# Altium PCB Urukul.PcbDoc (part 10 of 15)
Units mm, origin at the board's own origin, x right, y up, seen from the top; angles counter-clockwise.
Board outline 161.99 x 100 mm, 6 copper layers (L1, L2, L3, L4, P5, L6), stack 1.548 mm thick; 1078 components, 609 nets, 3798 pads, 2552 vias.
Unrouted connection lines stored in the file: 1.
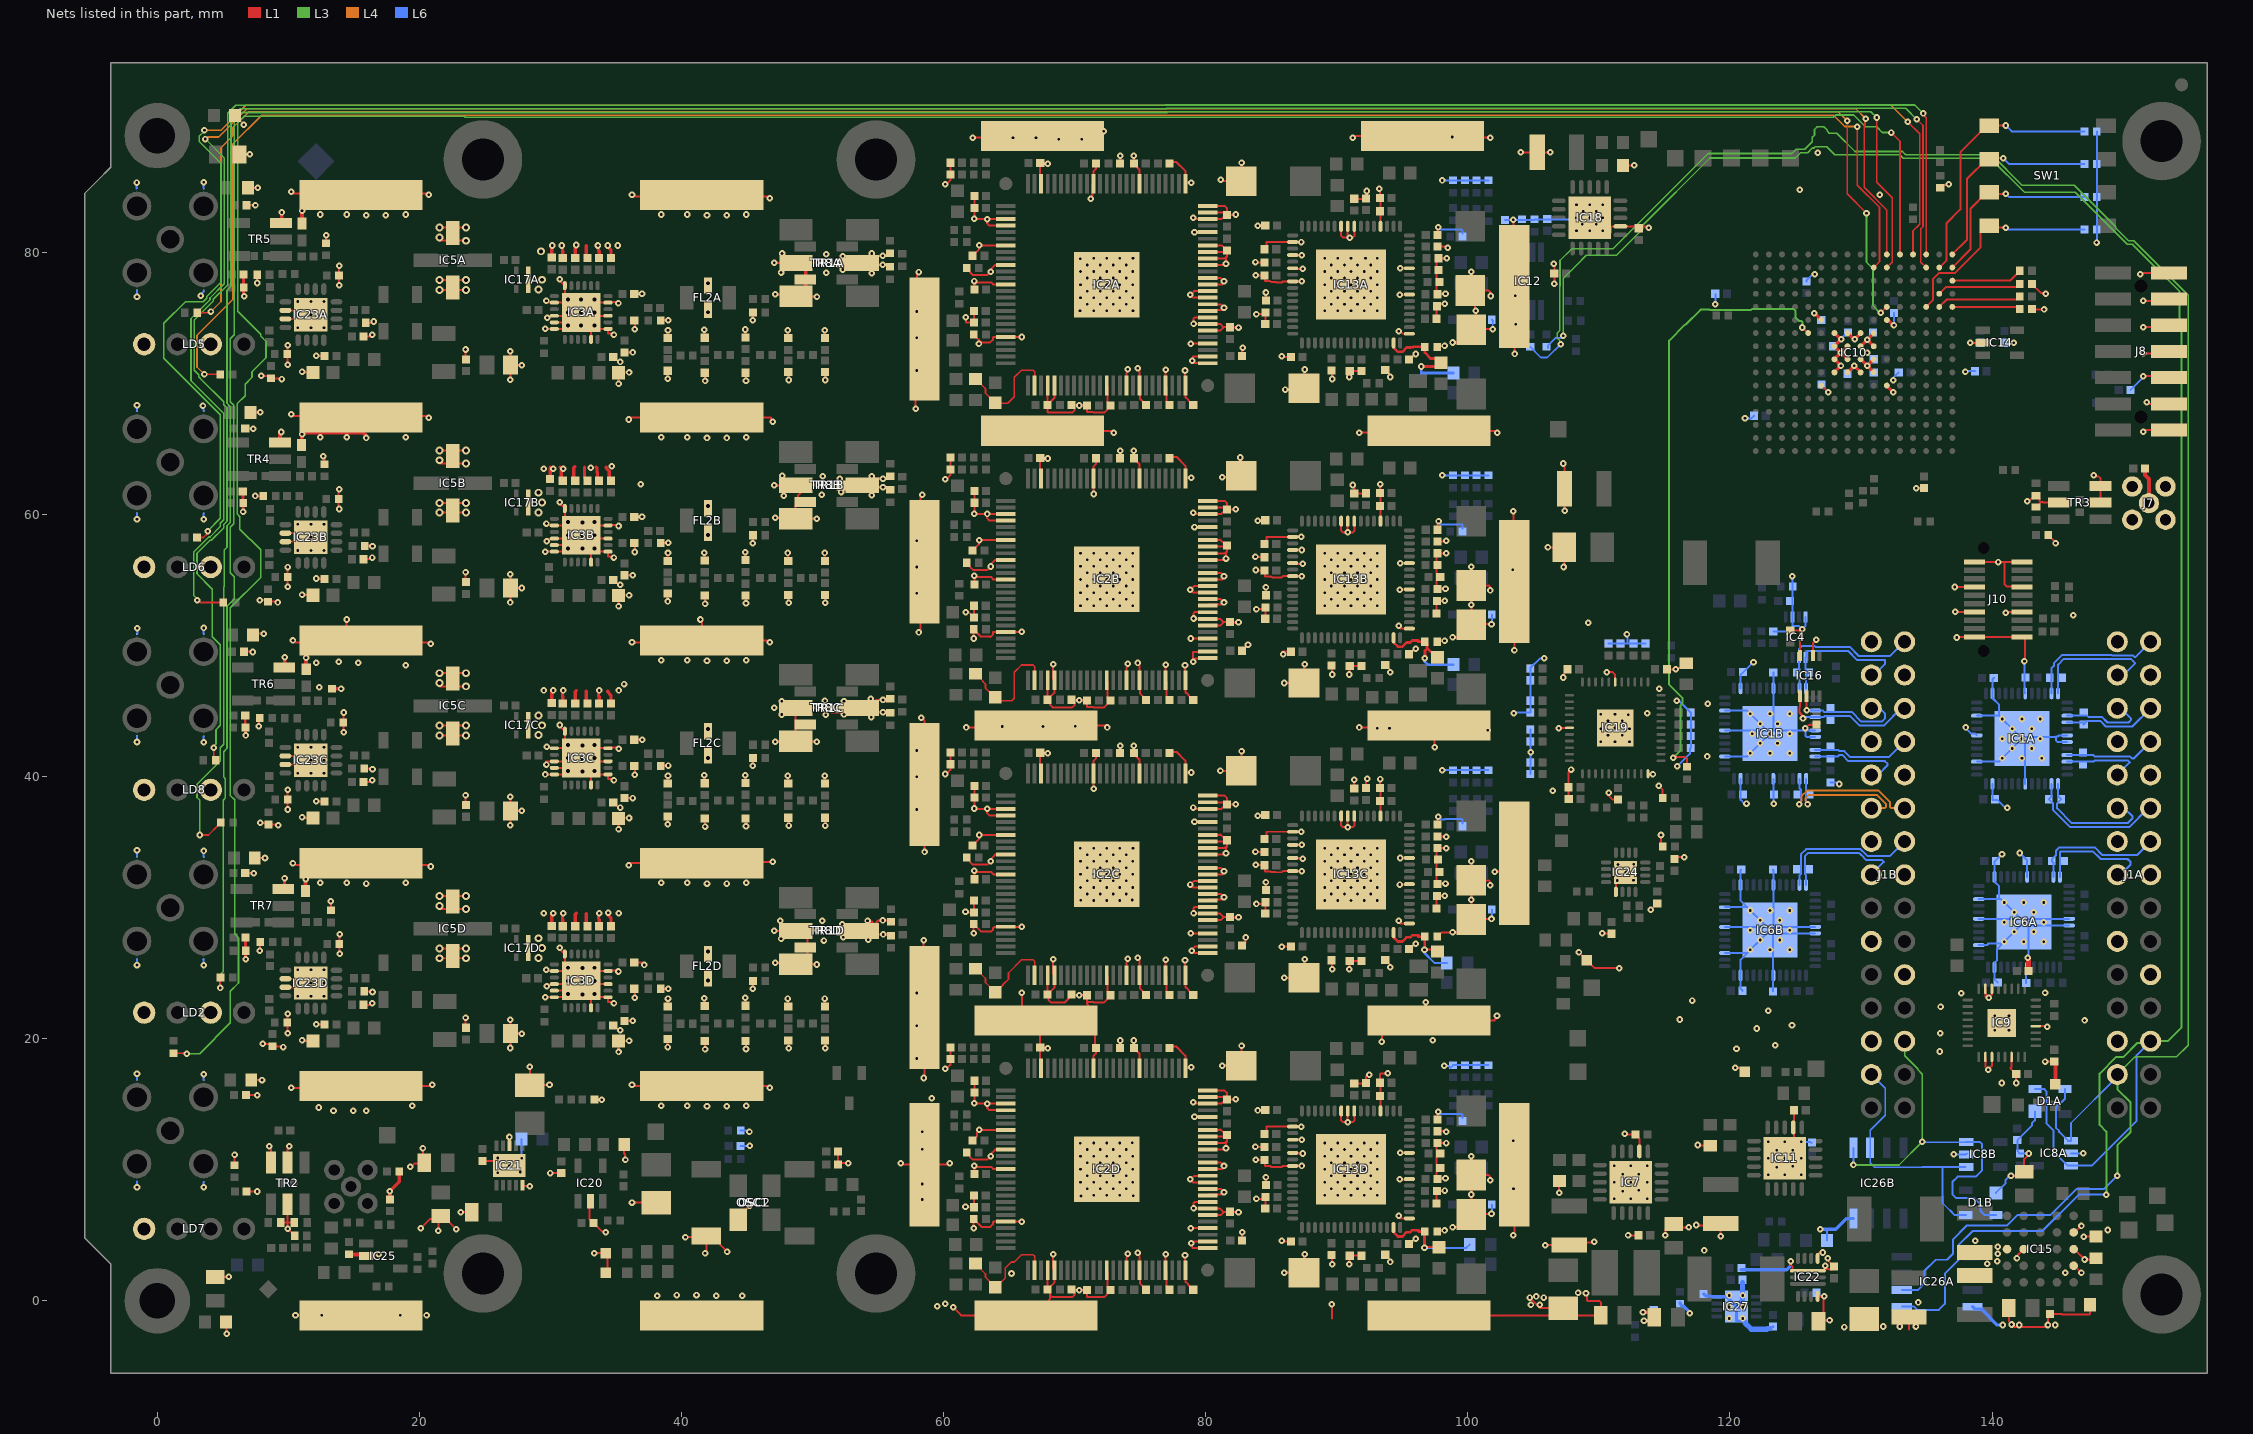
[diagram p12: the nets of this part, all layers, seen from the top]

## Via types
v1: diameter 0.5, hole 0.2, L1 to L6, tented both sides, 1964 vias
v2: diameter 0.5, hole 0.2, L1 to L6, 480 vias
v3: diameter 0.6, hole 0.3, L1 to L6, tented both sides, 52 vias
v4: diameter 0.6, hole 0.3, L1 to L6, 36 vias
v5: diameter 0.762, hole 0.508, L1 to L6, tented both sides, 20 vias

## Nets (pads, with @x,y where several pads share a name; then routed paths per layer and width w, separated by ;. In a path a pad name is that pad's centre, name@x,y a point inside that pad or via, vN(x,y) a via of type N, cw(c..) or ccw(c..) an arc to the next point about the centre after c; other vN are vias at no path point) (continued)
GND: (continued)
  L1 w0.152: v1@132.447,74.432 v1(132.515,74.432) ; 133.661,-2.174 C75.1@133.661,-1.246 ; v1(134.204,62.008) C208.1@134.819,62.008 ; R149.1@136.046,84.919 136.26,85.133 136.628,85.133 v1(136.681,85.186) ; v1(137.147,54.466) J10.8@138.669,54.466 ; v1(137.194,52.584) 137.217,52.561 J10.14@138.669,52.561 ; v1(137.316,50.611) 137.36,50.656 J10.20@138.669,50.656 J10.19@142.269,50.656 142.407,50.656 142.531,50.532 142.531,48.873 v1(142.472,48.813) ; v1(138.34,73.103) IC14.2@139.303,73.103 ; J10.2@138.669,56.371 v1(140.469,56.371) 140.953,56.371 ; IC9.2@139.491,18.605 139.491,17.85 v1(139.703,17.638) ; IC9.23@139.491,23.805 IC9.23@139.491,23.441 ; v1@139.741,17.676 139.991,17.926 IC9.3@139.991,18.605 ; IC9.22@139.991,23.805 139.991,23.371 v1(139.741,23.121) ; v1(141.031,52.512) 141.08,52.561 J10.13@142.269,52.561 ; C70.1@141.282,-0.555 141.282,-1.558 141.708,-1.984 144.127,-1.984 v1(144.264,-1.847) 144.264,-1.172 C67.1@144.432,-1.005 145.31,-1.005 145.338,-1.033 147.449,-1.033 147.482,-1 R55.2@147.482,-0.305 ; v1(141.444,9.541) 142.144,9.541 C64.1@142.444,9.841 142.444,10.791 v1@142.694,11.041 ; IC9.6@141.491,18.605 141.491,17.842 141.393,17.743 C89.1@141.844,17.292 141.844,16.628 v1(141.837,16.62) ; v1(141.901,3.233) 141.901,3.434 IC15.C2@142.412,3.945 ; J10.7@142.269,54.466 142.222,54.513 141.103,54.513 140.953,54.663 140.953,56.371 ; J10.1@142.269,56.371 140.953,56.371 ; v1(142.683,60.996) 142.777,60.996 142.992,61.212 143.131,61.212 C191.1@143.34,61.421 143.395,61.421 143.603,61.212 143.603,61.035 143.703,60.935 ; C86.1@142.82,24.963 C86.1@142.82,25.165 ; R174.1@143.044,75.687 143.085,75.645 v1(143.967,75.645) ; R172.1@143.044,77.581 143.718,76.907 144.044,76.907 v1(144.11,76.84) ; C195.2@143.34,60.572 143.703,60.935 ; IC9.12@143.341,20.955 144.191,20.955 v1(144.221,20.924) ; v1(144.043,18.257) 144.046,18.255 C90.1@144.741,18.255 ; R45.1@144.289,58.438 144.289,58.418 144.845,57.862 v1(144.845,57.81) ; LD10.1@144.832,16.529 LD10.1@144.895,16.466 ; TR3.5@145.097,60.905 143.903,60.905 143.872,60.935 143.703,60.935 ; IC15.D5@146.222,2.675 146.299,2.675 v1(146.821,2.153) ; IC15.C5@146.222,3.945 146.265,3.945 v1(147.057,3.153) 147.84,3.153 R82.2@147.932,3.245 ; IC15.B5@146.222,5.215 146.324,5.215 v1(146.821,5.712) ; v1(146.992,4.892) 146.995,4.895 R87.2@147.932,4.895 ; v1(147.758,62.983) 147.825,62.916 148.115,62.916 148.277,62.755 TR3.2@148.277,60.905 ; v1(151.302,78.324) 151.418,78.44 J8.13@153.494,78.44 ; v1(151.548,66.301) 151.687,66.44 J8.1@153.494,66.44 ; v1(151.548,70.551) 153.383,70.551 J8.5@153.494,70.44 ; v1(151.548,72.301) 153.355,72.301 J8.7@153.494,72.44 ; v1(151.548,74.301) 153.355,74.301 J8.9@153.494,74.44 ; v1(151.548,76.301) 153.355,76.301 J8.11@153.494,76.44 ; v1(151.798,68.551) 151.908,68.44 J8.3@153.494,68.44 ; v1@29.569,24.038 29.669,24.138 30.269,24.138 IC3D.16@30.294,24.163 IC3D.25@32.094,24.163 ; IC3D.25@31.594,23.663 IC3D.25@32.094,24.163 ; IC3C.25@31.594,40.663 IC3C.25@32.094,41.163 ; IC3B.25@31.594,57.663 IC3B.25@32.094,58.163 ; IC3A.25@31.594,74.663 IC3A.25@32.094,75.163 ; IC3D.25@32.094,24.163 32.319,24.388 IC3D.25@32.369,24.388 ; IC3C.25@32.094,41.163 32.319,41.388 IC3C.25@32.369,41.388 ; IC3B.25@32.094,58.163 32.319,58.388 IC3B.25@32.369,58.388 ; IC3A.25@32.094,75.163 v4(32.344,75.413) ; IC3D.25@32.369,24.388 v4(32.444,24.388) ; IC3C.25@32.369,41.388 v4(32.444,41.388) ; IC3B.25@32.369,58.388 v4(32.444,58.388) ; TR1C.3@48.714,42.685 TR8C.4@48.714,43.968 ; v1@50.369,45.225 51.142,45.225 51.157,45.211 ; 51.157,45.211 51.46,44.907 ; 51.157,45.211 54.226,45.211 TR1C.5@54.735,45.72 ; v1@54.512,45.943 TR1C.5@54.735,45.72 ; CLIP14.1@67.044,21.388 CLIP14.1@69.862,21.388 ; CLIP14.1@67.044,21.388 67.369,21.063 C159D.1@67.369,19.316 ; C120D.1@67.995,0.939 68.119,0.816 C120D.1@68.119,0.663 ; C120D.1@67.995,0.939 C120D.1@67.919,0.863 C120D.1@68.119,0.663 ; C120C.1@67.995,23.439 67.995,22.968 68.185,22.778 69.26,22.778 69.798,23.316 v1(70.344,23.316) C109C.1@70.944,23.316 70.944,22.806 ; 68.119,0.437 C120D.1@68.119,0.663 ; CLIP14.1@69.862,21.388 71.035,22.56 70.944,22.651 70.944,22.806 ; 81.619,12.131 C105D.1@81.619,12.641 ; 81.619,34.631 C105C.1@81.619,35.141 ; 81.619,57.131 C105B.1@81.619,57.641 ; 81.619,79.631 C105A.1@81.619,80.141 ; v1@82.979,27.725 83.046,27.792 v1(83.046,27.725) ; v1@82.979,27.725 v1(83.046,27.725) ; v1@100.253,56.112 100.264,56.122 C162B.2@100.264,54.588 ; C115D.2@100.264,6.588 v1(100.264,8.11) C162D.2@100.264,9.588 ; C115C.2@100.264,29.088 v1(100.264,30.61) C162C.2@100.264,32.088 ; C162C.2@100.264,32.088 v1(100.264,33.53) v1@100.264,33.601 ; v1@100.264,33.601 100.253,33.612 100.264,33.622 v1@100.264,33.601 ; C115B.2@100.264,51.588 v1(100.264,53.11) C162B.2@100.264,54.588 ; IC9.23@139.491,23.441 139.491,23.197 139.666,23.197 v1(139.741,23.121) ; IC9.23@139.491,23.441 139.741,23.19 v1(139.741,23.121)
  L1 w0.2: C32.1@6.522,61.766 6.542,61.746 R65.1@6.542,60.866 v1(6.542,60.213) ; C25.1@6.581,78.308 6.581,76.703 v1(6.62,76.663) ; v1@6.708,43.187 C33.2@6.708,44.653 ; C41.1@6.733,27.711 6.733,26.089 v1(6.759,26.063)
  L1 w0.254: TR7.1@9.601,31.408 9.708,31.516 v1(9.708,32.235) ; R4C.1@13.323,46.688 13.348,46.713 v1(14.019,46.713) ; v1(17.744,8.348) 18.464,9.068 R190.2@18.464,9.865 ; C20B.1@29.973,62.699 29.973,63.581 v1@30.001,63.61 ; C20D.1@30.094,28.613 30.094,29.495 v1@30.123,29.524 ; C20C.1@30.094,45.613 30.094,46.495 v1@30.123,46.524 ; C20A.1@30.094,79.613 30.094,80.495 v1(30.123,80.524) ; v1@30.751,63.61 30.799,63.563 30.799,63.194 30.819,63.173 C19B.1@30.819,62.663 ; v1@30.873,29.524 30.92,29.477 30.92,29.108 30.94,29.088 C19D.1@30.94,28.578 ; v1@30.873,46.524 30.92,46.477 30.92,46.108 30.94,46.088 C19C.1@30.94,45.578 ; v1(30.873,80.524) 30.92,80.477 30.92,80.108 30.94,80.088 C19A.1@30.94,79.578 ; C18B.1@31.769,62.663 31.769,63.57 31.848,63.649 ; C18D.1@31.89,28.578 31.89,29.485 31.969,29.563 ; C18C.1@31.89,45.578 31.89,46.485 31.969,46.563 ; C18A.1@31.89,79.578 31.89,80.485 v1(31.969,80.563) ; 32.598,63.61 32.598,62.76 C17B.1@32.694,62.663 ; 32.719,29.524 32.719,28.674 C17D.1@32.815,28.578 ; 32.719,46.524 32.719,45.674 C17C.1@32.815,45.578 ; 32.719,80.524 32.719,79.674 C17A.1@32.815,79.578 ; 33.501,63.61 33.549,63.563 33.549,63.219 33.594,63.173 C16B.1@33.594,62.663 ; v1@33.623,29.524 33.67,29.477 33.67,29.133 33.715,29.088 C16D.1@33.715,28.578 ; v1@33.623,46.524 33.67,46.477 33.67,46.133 33.715,46.088 C16C.1@33.715,45.578 ; v1(33.623,80.524) 33.67,80.477 33.67,80.133 33.715,80.088 C16A.1@33.715,79.578 ; 34.251,63.61 34.251,63.543 34.494,63.3 C15B.1@34.494,62.663 ; v1@34.373,29.524 34.373,29.457 34.615,29.215 C15D.1@34.615,28.578 ; 34.373,46.524 34.373,46.457 34.615,46.215 C15C.1@34.615,45.578 ; v1(34.373,80.524) 34.373,80.457 34.615,80.215 C15A.1@34.615,79.578 ; TR1A.2@49.469,78.738 49.469,77.938 49.489,77.918 49.489,77.343 TR1A.3@49.519,77.313 ; v1(113.365,-0.88) 113.863,-0.88 C179.1@114.231,-1.247 113.958,-1.52 v1(113.443,-1.52) ; v2@119.872,-1.348 v2(119.939,-1.348) ; v1@126.451,75.353 IC10.F6@126.964,74.841 ; IC10.K7@127.97,70.841 127.97,70.85 128.452,71.332 128.452,71.367 127.979,71.841 IC10.J7@127.97,71.841 v1(128.47,72.341) ; IC10.G7@127.97,73.841 127.993,73.841 128.458,73.376 v1(128.481,73.376) 128.481,73.364 127.97,72.853 IC10.H7@127.97,72.841 v1(128.47,72.341) ; IC10.K8@128.97,70.841 128.97,70.845 129.465,71.341 129.475,71.341 129.97,70.845 IC10.K9@129.97,70.841 ; IC10.J8@128.97,71.841 v1(128.47,72.341) ; IC10.H8@128.97,72.841 v1(128.47,72.341) ; IC10.G8@128.97,73.841 128.974,73.841 129.326,73.488 v1@129.403,73.488 ; v1(129.53,73.362) 129.53,73.381 129.97,73.821 IC10.G9@129.97,73.841 ; IC10.J9@129.97,71.841 129.975,71.841 130.465,71.35 v1(130.47,71.35) ; v1(130.467,72.341) 130.467,72.342 IC10.H9@129.97,72.841 IC10.H9@129.97,72.841 129.973,72.841 130.467,73.335 v1@130.467,73.338 ; IC10.K10@130.97,70.841 130.97,70.845 130.581,71.234 130.581,71.333 130.598,71.35 130.586,71.362 130.586,71.461 130.965,71.841 IC10.J10@130.97,71.841 ; IC10.H10@130.97,72.841 130.967,72.841 v1@130.47,73.338 ; IC10.G10@130.97,73.841 130.97,73.838 v1@130.47,73.338 ; IC10.L11@131.971,69.841 v1(132.474,69.338) ; IC10.F11@132.038,74.841 v1@132.447,74.432 ; v1@130.467,73.338 v1@130.47,73.338 ; v1@130.467,73.338 v1@130.47,73.338
  L1 w0.298: TR4.1@9.359,65.483 9.359,66.147 9.45,66.238 v1(9.45,66.293) ; TR5.1@9.44,82.258 9.494,82.312 v1(9.494,83.046) ; TR6.1@9.698,48.333 9.723,48.358 v1(9.723,49.114) ; D2B.1@10.999,65.304 11.022,65.327 11.022,66.089 v1(11.044,66.111) 11.099,66.111 11.249,66.261 CLIP21.1@14.417,66.261 ; D2A.1@11.044,82.429 v1(11.044,83.163) ; D2D.1@11.319,31.441 v1(11.319,32.175) ; D2C.1@11.349,48.334 v1(11.349,49.068) ; R189.1@14.619,3.543 16.889,3.543 v1(16.894,3.538) ; CLIP21.1@15.544,67.388 CLIP21.1@14.417,66.261 ; 15.846,66.113 15.699,66.261 CLIP21.1@14.417,66.261 ; C212.2@17.744,7.738 v1(17.744,8.348) ; C90.1@144.741,18.255 144.832,18.163 LD10.1@144.832,16.529
  L1 w0.381: v1(142.721,26.188) 142.794,26.115 C86.1@142.794,25.165
  L3 w0.152: v1(78.819,9.263) v1@78.819,9.388 ; v1(78.819,31.763) v1@78.819,31.888 ; v1(78.819,54.263) v1@78.819,54.388 ; v1(78.819,76.763) v1@78.819,76.888 ; v1@82.766,5.246 v1(82.792,5.221) ; v1@83.894,14.588 v1(83.959,14.523) ; v1@83.894,37.088 v1(83.959,37.023) ; v1@83.894,59.588 v1(83.959,59.523) ; v1@83.894,82.088 v1(83.959,82.023) ; v1(87.394,11.238) v1@87.494,11.338 ; v1(87.394,33.738) v1@87.494,33.838 ; v1(87.394,56.238) v1@87.494,56.338 ; v1(87.394,78.738) v1@87.494,78.838 ; v1(91.222,62.249) v1@91.222,62.407
  L6 w0.152: NT3.2@-1.575,84.887 v1(-1.575,85.327) ; v1(-1.549,8.653) NT19.2@-1.549,9.093 ; NT17.2@-1.549,16.891 v1(-1.549,17.331) ; v1(-1.549,25.62) NT16.2@-1.549,26.06 ; NT14.2@-1.549,33.934 v1(-1.549,34.375) ; v1(-1.549,42.638) NT9.2@-1.549,43.078 ; v1(-1.549,59.631) NT6.2@-1.549,60.071 ; NT8.2@-1.549,67.894 v1(-1.549,68.335) ; v1(-1.549,76.623) NT4.2@-1.549,77.064 ; NT12.2@-1.524,50.876 v1(-1.524,51.317) ; v1(3.327,76.683) 3.327,76.777 3.531,76.98 NT2.2@3.531,77.038 ; v1(3.481,68.311) 3.531,68.262 NT7.2@3.531,67.92 ; v1(3.531,8.653) NT18.2@3.531,9.068 ; NT20.2@3.531,16.84 v1(3.531,17.281) ; v1(3.531,25.595) NT13.2@3.531,26.035 ; NT15.2@3.531,33.884 v1(3.531,34.324) ; v1(3.531,42.613) NT11.2@3.531,43.053 ; NT10.2@3.531,50.902 v1(3.531,51.342) ; v1(3.531,59.631) NT5.2@3.531,60.071 ; NT1.2@3.531,84.912 v1(3.531,85.353) ; R176.1@27.794,12.338 27.794,10.883 v2(27.796,10.881) ; C145.1@44.504,11.823 v1(45.191,11.823) ; R168.1@44.504,12.999 44.994,12.999 45.104,12.888 v1(45.182,12.888) ; v1(97.752,14.43) 97.94,14.242 98.256,14.242 98.265,14.251 99.515,14.251 99.589,14.178 R15D.2@99.589,13.938 ; v1(97.752,36.93) 97.94,36.742 98.256,36.742 98.265,36.751 99.53,36.751 99.589,36.693 R15C.2@99.589,36.438 ; v1(97.752,81.93) 97.94,81.742 98.256,81.742 98.265,81.751 99.503,81.751 99.589,81.665 R15A.2@99.589,81.438 ; v1(97.764,59.486) 97.764,59.418 97.94,59.242 98.256,59.242 98.265,59.251 99.575,59.251 99.589,59.237 R15B.2@99.589,58.938 ; v1(98.041,40.488) R105C.1@98.869,40.488 R104C.1@99.769,40.488 R107C.1@100.669,40.488 R106C.1@101.569,40.488 ; v1(98.041,62.988) R105B.1@98.869,62.988 R104B.1@99.769,62.988 R107B.1@100.669,62.988 R106B.1@101.569,62.988 ; v1(98.041,85.488) R105A.1@98.869,85.488 R104A.1@99.769,85.488 R107A.1@100.669,85.488 R106A.1@101.569,85.488 ; v1(98.2,17.927) 98.512,17.927 98.66,17.779 R105D.1@98.869,17.988 R104D.1@99.769,17.988 R107D.1@100.669,17.988 R106D.1@101.569,17.988 ; v1(101.803,6.637) 101.834,6.668 R94D.1@101.834,7.36 ; v1(101.803,29.137) 101.834,29.168 R94C.1@101.834,29.86 ; v1(101.803,51.637) 101.834,51.668 R94B.1@101.834,52.36 ; R94A.1@101.834,74.86 101.935,74.76 101.9,74.725 v1(101.9,74.137) ; R126.1@102.835,82.466 105.045,82.466 R128.1@105.096,82.517 108.173,82.517 v2(108.294,82.638) ; v1(103.505,44.83) 103.563,44.888 R62.1@104.774,44.888 R63.1@104.774,45.788 R69.1@104.774,47.348 R77.1@104.774,48.248 104.774,48.284 105.511,49.021 v1(105.816,49.021) ; v1(103.623,76.688) 103.623,75.621 IC12.4@103.638,75.605 ; R42.1@104.774,40.188 R37.1@104.774,41.088 R60.1@104.774,42.688 R61.1@104.774,43.588 ; v1(106.594,77.602) 106.696,77.602 v1@106.747,77.551 ; R34.1@110.744,50.158 R70.1@111.644,50.158 112.166,50.158 ; v1(112.141,50.85) 112.166,50.824 112.166,50.158 ; v1(113.365,-0.88) 113.989,-0.88 R197.1@114.187,-0.682 ; v1(113.443,-1.52) v1@113.509,-1.453 ; R72.1@113.544,50.158 R71.1@112.644,50.158 112.166,50.158 ; v1(115.944,45.791) 116.111,45.791 R76.1@117.014,44.888 R95.1@117.014,43.988 R102.1@117.014,42.188 116.948,42.122 116.948,41.739 v1(115.99,40.781) ; v1(118.876,76.037) 118.881,76.042 C209.1@118.881,76.84 ; IC6B.27@119.608,26.532 IC6B.49@121.308,26.532 ; IC6B.31@119.608,28.532 IC6B.49@122.808,28.532 ; IC6B.34@119.608,30.032 IC6B.49@121.308,30.032 ; IC1B.27@119.608,41.532 121.308,41.532 v2(121.558,41.782) v2(122.308,42.532) v2(123.058,43.282) ; IC1B.31@119.608,43.532 IC1B.49@122.808,43.532 ; IC1B.34@119.608,45.032 121.308,45.032 v2(121.558,44.782) v2(122.308,44.032) IC1B.49@122.808,43.532 ; IC1B.23@120.808,39.832 120.808,38.225 121.09,37.942 v1(121.263,37.942) ; IC1B.38@120.808,46.732 120.808,47.782 121.763,48.737 v1(121.796,48.737) ; C6A.1@120.858,32.907 120.808,32.857 IC6B.38@120.808,31.732 120.808,30.532 IC6B.49@121.308,30.032 ; C7B.1@120.958,23.657 120.808,23.807 IC6B.23@120.808,24.832 120.808,26.032 IC6B.49@121.308,26.532 ; v1(121.147,67.342) 121.639,67.342 C152.1@121.835,67.538 ; C8B.1@123.283,23.607 123.283,28.057 123.308,28.032 IC6B.7@126.508,28.032 ; C6B.1@123.283,32.907 123.308,32.882 IC6B.43@123.308,31.732 IC6B.49@123.308,28.532 ; IC1B.18@123.308,39.832 123.308,37.975 v1(123.348,37.935) ; C4A.1@123.308,47.932 IC1B.43@123.308,46.732 IC1B.49@123.308,43.532 ; C13.1@123.308,51.082 124.608,51.082 124.758,51.232 124.758,51.507 ; v1(124.758,55.282) IC4.2@124.758,52.182 124.758,51.507 ; v2(125.431,12.13) 126.141,12.13 C160.2@126.223,12.049 ; IC4.4@125.758,52.182 125.758,51.482 v1(125.508,51.232) 125.233,51.507 124.758,51.507 ; v1@125.778,43.507 125.778,43.1 125.845,43.032 IC1B.7@126.508,43.032 ; C198.1@125.831,77.787 125.831,77.855 126.317,78.341 v1(126.47,78.341) ; v1(126.445,75.353) 126.957,74.841 C193.1@126.97,74.841 ; IC6B.6@126.508,28.532 IC6B.49@123.308,28.532 ; IC1B.6@126.508,43.532 IC1B.49@123.308,43.532 ; C139.2@126.591,0.61 126.825,0.376 127.146,0.376 v1(127.181,0.341) ; v1(126.886,5.45) 126.933,5.403 127.317,5.403 127.406,5.314 R136.1@127.406,4.614 ; C187.1@126.974,69.909 126.974,69.842 v1(127.498,69.319) ; C5A.1@127.683,39.557 128.225,39.557 v1(128.348,39.435) ; C104.1@127.87,72.841 128.906,73.877 C197.1@129.006,73.877 ; C184.1@128.97,70.741 129.47,71.241 v1(129.47,71.35) ; v1@130.47,71.341 C188.1@130.97,70.841 ; v1@130.475,71.345 130.736,71.607 C186.1@130.97,71.841 ; v1@130.537,73.523 C192.1@130.902,73.888 ; v1(132.47,70.244) 132.47,70.432 C199.1@132.878,70.84 ; v1(132.515,74.432) C200.1@132.515,75.384 ; v1(137.073,11.171) 137.086,11.158 137.998,11.158 IC8B.2@138.073,11.233 ; v1(137.97,70.904) 137.998,70.931 C175.1@138.686,70.931 ; v1(138.004,43.749) 138.004,43.674 138.385,43.293 138.684,43.293 IC1A.31@138.831,43.146 ; v1(138.34,73.103) C185.1@139.128,73.103 ; IC1A.27@138.831,41.146 140.531,41.146 v2(140.781,41.396) v2(141.531,42.146) v2(142.281,42.896) ; IC1A.34@138.831,44.646 IC1A.49@140.531,44.646 ; IC6A.27@138.981,27.146 139.644,27.146 139.681,27.183 139.681,27.246 IC6A.49@140.781,27.246 ; IC6A.31@138.981,29.146 IC6A.49@142.181,29.146 ; IC6A.34@138.981,30.646 IC6A.49@140.531,30.646 ; IC1A.23@140.031,39.446 140.031,38.196 140.431,38.196 141.006,37.621 v1(141.156,37.621) ; C4B.1@140.156,47.546 C4B.1@140.131,47.521 140.031,47.421 IC1A.38@140.031,46.346 140.031,45.996 140.531,45.496 IC1A.49@140.531,44.646 ; D1B.1@140.294,8.238 141.039,8.983 141.039,9.23 141.35,9.541 v1(141.444,9.541) ; C2B.1@140.431,24.296 140.181,24.546 IC6A.23@140.181,25.446 140.181,25.796 140.381,25.996 140.381,26.846 IC6A.49@140.781,27.246 ; v1(140.756,34.071) 140.181,33.496 IC6A.38@140.181,32.346 140.181,31.996 140.531,31.646 IC6A.49@140.531,30.646 ; C201.1@140.953,73.103 140.968,73.118 v1(141.653,73.118) ; v1(142.106,34.171) 142.681,33.596 IC6A.43@142.681,32.346 ; v1(142.472,48.813) 142.472,46.405 IC1A.43@142.531,46.346 ; IC1A.18@142.531,39.446 142.531,42.646 v2(142.281,42.896) ; C7A.1@142.606,24.246 142.606,25.371 IC6A.18@142.681,25.446 142.681,26.108 142.794,26.108 142.794,28.533 IC6A.49@142.681,28.646 ; IC6A.49@142.681,29.146 IC6A.6@145.881,29.146 ; v1(142.802,11.238) 142.797,11.233 C10A.1@142.123,11.233 141.923,11.433 C10B.1@141.923,12.258 142.31,12.645 142.318,12.645 143.044,13.371 143.044,13.538 143.269,13.763 D1A.1@143.269,14.463 ; IC1A.7@145.731,42.646 144.981,42.646 144.881,42.746 144.881,43.021 ; IC1A.6@145.731,43.146 145.095,43.146 145.019,43.07 144.881,43.07 144.881,43.021 ; IC6A.7@145.881,28.646 IC6A.49@142.681,28.646 ; IC8A.2@146.023,11.258 146.956,11.258 v1(146.968,11.247) ; v1(147.973,80.749) 147.994,80.77 R111.1@147.994,81.733 R83.1@147.994,84.233 R85.1@147.994,86.733 R86.1@147.994,89.233 ; C210.1@150.569,69.506 151.548,70.485 v1(151.548,70.551) ; IC6B.49@121.308,26.532 v2(121.558,26.782) v2(122.308,27.532) v2(123.058,28.282) ; IC6B.49@121.308,30.032 v2(121.558,29.782) v2(122.308,29.032) IC6B.49@122.808,28.532 ; IC6B.49@122.808,28.532 v2(123.058,28.282) ; IC1B.49@122.808,43.532 v2(123.058,43.282) ; v2(123.058,28.282) IC6B.49@123.308,28.532 ; v2(123.058,43.282) IC1B.49@123.308,43.532 ; IC6A.49@140.531,30.646 140.681,30.646 v2(140.931,30.396) v2(141.681,29.646) IC6A.49@142.181,29.146 ; IC1A.49@140.531,44.646 v2(140.781,44.396) v2(141.531,43.646) v2(142.281,42.896) ; IC6A.49@140.781,27.246 v2(140.931,27.396) v2(141.681,28.146) v2(142.431,28.896) ; IC6A.49@142.181,29.146 v2(142.431,28.896) ; v2(142.281,42.896) 142.406,43.021 144.881,43.021 ; v2(142.431,28.896) IC6A.49@142.681,28.646
  L6 w0.2: IC27.9@120.498,-0.441 120.498,-1.516 IC27.9@121.223,-1.516 ; C218.1@123.133,-2.13 C218.1@123.291,-1.972
  L6 w0.254: R195.1@116.194,-0.127 116.194,-0.217 116.377,-0.4 116.466,-0.4 116.943,-0.877 v1(116.943,-0.944) ; C216.1@117.99,0.523 118.14,0.373 118.491,0.373 118.532,0.332 118.975,0.332 IC27.8@118.998,0.309 119.75,0.309 120.498,-0.439 IC27.9@120.498,-0.441 ; C178.1@120.873,2.366 124.342,2.366 124.619,2.643 124.619,3.007 v1(124.629,3.017) ; v1(126.886,5.45) 128.091,5.45 128.925,6.283 IC26B.4@129.425,6.283 ; IC26A.4@138.511,-0.451 138.684,-0.624 139.18,-0.624 140.403,-1.847 v1(140.821,-1.847)
  L6 w0.4: IC27.9@120.498,-0.441 120.961,0.022 C217.1@120.961,1.378 ; 121.144,-1.687 121.619,-2.162 122.807,-2.162 122.856,-2.113 C218.1@123.051,-2.113
  other v1: 128.723,-2.001 131.694,-1.959 132.944,-1.959 134.194,-1.959 142.071,-1.847 144.821,-1.847 141.487,-1.807 10.544,-1.112 12.544,-1.112 18.544,-1.112 20.544,-1.112 59.512,-0.406 104.817,-0.299 60.122,-0.229 134.376,-0.126 105.794,0.249 105.232,0.33 38.144,0.388 42.644,0.388 44.644,0.388 39.644,0.438 41.144,0.438 108.407,0.61 65.176,2.083 145.571,2.153 139.632,2.832 140.391,3.025 140.442,3.584 43.473,3.749 118.044,3.841 140.442,4.117 138.717,4.576 148.821,5.403 58.369,7.726 103.48,8.56 58.369,8.913 58.369,11.554 103.454,12.217 58.369,12.888 13.444,14.488 14.944,14.488 15.944,14.488 12.305,14.749 41.944,14.838 43.444,14.838 19.444,14.888 38.444,14.888 40.444,14.888 44.944,14.888 59.106,15.469 140.728,16.62 57.944,18.488 136.017,19.025 120.498,19.228 123.444,19.507 97.333,19.888 136.034,20.422 140.191,20.655 141.291,20.655 122.047,20.777 57.944,20.988 124.733,21.035 147.057,21.391 116.18,21.463 140.191,21.755 141.291,21.755 122.927,22.124 136.068,22.428 16.394,22.713 117.119,22.911 57.944,23.488 137.644,23.479 144.044,23.494 29.667,25.273 50.869,27.488 54.244,27.563 47.594,27.613 52.347,27.74 52.272,28.74 47.544,28.988 50.744,29.013 54.194,29.013 29.473,29.573 30.223,29.573 30.973,29.573 33.723,29.573 35.223,29.573 34.405,29.605 15.944,31.838 41.944,31.838 43.444,31.838 12.444,31.888 14.444,31.888 18.944,31.888 38.444,31.888 40.444,31.888 44.944,31.888 57.944,37.488 106.484,38.913 16.394,39.713 57.944,39.988 118.274,41.535 104.8,41.858 57.944,41.988 110.694,43.163 111.794,43.163 101.515,43.541 93.082,43.693 94.022,43.693 64.481,43.82 67.58,43.82 70.044,43.846 110.694,44.263 111.794,44.263 54.469,44.538 50.994,44.713 47.644,44.738 113.679,44.83 47.069,45.238 118.312,45.552 47.644,45.738 52.397,45.741 50.944,45.788 29.473,46.573 30.223,46.573 30.973,46.573 33.723,46.573 35.223,46.573 114.593,46.69 12.37,46.816 35.614,47.061 18.944,48.488 12.119,48.699 15.344,48.699 13.844,48.749 79.044,48.749 41.944,48.838 43.444,48.838 38.444,48.888 40.444,48.888 44.944,48.888 109.198,51.738 146.191,52.314 57.944,53.988 103.42,55.784 57.944,55.988 16.394,56.713 106.113,57.493 57.944,57.988 47.794,61.438 54.519,61.463 50.694,61.513 52.172,61.716 36.884,62.301 52.072,62.717 50.769,62.913 54.519,62.913 47.694,62.963 29.473,63.499 30.223,63.499 30.973,63.499 33.074,63.571 34.665,63.69 15.944,65.838 41.944,65.838 43.444,65.838 12.444,65.888 14.444,65.888 18.944,65.888 38.444,65.888 40.444,65.888 44.944,65.888 57.944,70.988 128.47,71.358 130.47,73.335 57.944,73.488 16.394,73.713 103.648,74.503 57.944,75.488 54.519,78.413 51.044,78.438 47.594,78.463 52.297,78.692 55.347,79.045 52.297,79.692 51.044,79.863 47.669,79.913 54.519,79.913 35.123,80.524 15.944,82.838 17.444,82.838 41.944,82.838 43.444,82.838 12.444,82.888 14.444,82.888 18.944,82.888 38.444,82.888 40.444,82.888 44.944,82.888 125.32,84.791 126.695,87.608 68.794,88.638 70.544,88.638 98.822,88.804
  other v2: 120.963,-1.348 119.939,-0.458 120.963,-0.47 119.939,0.409 120.963,0.409 111.181,7.797 112.431,7.797 113.681,7.797 70.485,8.001 74.473,8.026 71.444,8.041 72.444,8.041 73.444,8.041 89.084,8.041 90.084,8.041 91.084,8.041 92.084,8.041 93.084,8.041 111.831,8.347 113.031,8.447 70.944,8.541 71.944,8.541 72.944,8.541 73.944,8.541 89.584,8.541 90.584,8.541 91.584,8.541 92.584,8.541 70.444,9.041 71.444,9.041 72.444,9.041 73.444,9.041 74.444,9.041 89.084,9.041 90.084,9.041 91.084,9.041 92.084,9.041 93.084,9.041 111.181,9.047 112.431,9.047 113.681,9.047 70.944,9.541 71.944,9.541 72.944,9.541 73.944,9.541 89.584,9.541 90.584,9.541 91.584,9.541 92.584,9.541 111.831,9.647 113.031,9.647 122.931,9.63 124.181,9.63 125.431,9.63 25.973,9.766 27.685,9.824 70.444,10.041 71.444,10.041 72.444,10.041 73.444,10.041 74.444,10.041 89.084,10.041 90.084,10.041 91.084,10.041 92.084,10.041 93.084,10.041 123.581,10.18 124.781,10.28 111.181,10.297 112.431,10.297 113.681,10.297 70.944,10.541 71.944,10.541 72.944,10.541 73.944,10.541 89.584,10.541 90.584,10.541 91.584,10.541 92.584,10.541 25.973,10.895 122.931,10.88 125.431,10.88 70.444,11.041 71.444,11.041 72.444,11.041 73.444,11.041 74.444,11.041 89.084,11.041 90.084,11.041 91.084,11.041 92.084,11.041 93.084,11.041 123.581,11.48 70.944,11.541 71.944,11.541 72.944,11.541 73.944,11.541 89.584,11.541 90.584,11.541 91.584,11.541 92.584,11.541 70.434,12.014 71.444,12.041 72.444,12.041 73.444,12.041 74.397,12.065 89.084,12.041 90.084,12.041 91.084,12.041 92.084,12.041 93.084,12.041 122.931,12.13 124.181,12.13 10.723,23.249 11.723,23.249 12.723,23.249 10.723,24.249 12.723,24.249 10.723,25.249 11.723,25.249 12.723,25.249 123.058,26.782 124.558,26.782 142.431,27.396 143.931,27.396 123.808,27.532 143.181,28.146 121.558,28.282 124.558,28.282 140.931,28.896 143.931,28.896 123.808,29.032 143.181,29.646 123.058,29.782 124.558,29.782 142.431,30.396 143.931,30.396 70.46,30.556 71.444,30.541 72.444,30.541 73.444,30.541 89.084,30.541 90.084,30.541 91.084,30.541 92.084,30.541 93.084,30.541 74.397,30.582 70.944,31.041 71.944,31.041 72.944,31.041 73.944,31.041 89.584,31.041 90.584,31.041 91.584,31.041 92.584,31.041 70.444,31.541 71.444,31.541 72.444,31.541 73.444,31.541 74.444,31.541 89.084,31.541 90.084,31.541 91.084,31.541 92.084,31.541 93.084,31.541 70.944,32.041 71.944,32.041 72.944,32.041 73.944,32.041 89.584,32.041 90.584,32.041 91.584,32.041 92.584,32.041 111.408,32.075 70.444,32.541 71.444,32.541 72.444,32.541 73.444,32.541 74.444,32.541 89.084,32.541 90.084,32.541 91.084,32.541 92.084,32.541 93.084,32.541 70.944,33.041 71.944,33.041 72.944,33.041 73.944,33.041 89.584,33.041 90.584,33.041 91.584,33.041 92.584,33.041 111.458,33.294 70.444,33.541 71.444,33.541 72.444,33.541 73.444,33.541 74.444,33.541 89.084,33.541 90.084,33.541 91.084,33.541 92.084,33.541 93.084,33.541 70.944,34.041 71.944,34.041 72.944,34.041 73.944,34.041 89.584,34.041 90.584,34.041 91.584,34.041 92.584,34.041 70.434,34.519 74.447,34.519 71.444,34.541 72.444,34.541 73.444,34.541 89.084,34.541 90.084,34.541 91.084,34.541 92.084,34.541 93.084,34.541 10.723,40.249 11.723,40.249 12.723,40.249 10.723,41.249 12.723,41.249 142.281,41.396 143.781,41.396 123.058,41.782 124.558,41.782 143.031,42.146 10.723,42.249 11.723,42.249 12.723,42.249 123.632,42.532 110.131,42.647 111.231,42.647 112.331,42.647 140.781,42.896 143.666,42.895 121.708,43.282 124.558,43.282 110.131,43.647 112.331,43.647 143.031,43.646 111.231,43.713 123.632,44.032 142.281,44.396 143.686,44.396 112.227,44.705 110.131,44.747 111.231,44.747 123.058,44.782 124.558,44.782 70.444,53.041 71.444,53.041 72.444,53.041 73.444,53.041 74.444,53.041 89.084,53.041 90.084,53.041 91.084,53.041 92.084,53.041 93.084,53.041 70.944,53.541 71.944,53.541 72.944,53.541 73.944,53.541 89.584,53.541 90.584,53.541 91.584,53.541 92.584,53.541 70.444,54.041 71.444,54.041 72.444,54.041 73.444,54.041 74.444,54.041 89.084,54.041 90.084,54.041 91.084,54.041 92.084,54.041 93.084,54.041 70.944,54.541 71.944,54.541 72.944,54.541 73.944,54.541 89.584,54.541 90.584,54.541 91.584,54.541 92.584,54.541 70.444,55.041 71.444,55.041 72.444,55.041 73.444,55.041 74.444,55.041 89.084,55.041 90.084,55.041 91.084,55.041 92.084,55.041 93.084,55.041 70.944,55.541 71.944,55.541 72.944,55.541 73.944,55.541 89.584,55.541 90.584,55.541 91.584,55.541 92.584,55.541 70.444,56.041 71.444,56.041 72.444,56.041 73.444,56.041 74.444,56.041 89.084,56.041 90.084,56.041 91.084,56.041 92.084,56.041 93.084,56.041 70.944,56.541 71.944,56.541 72.944,56.541 73.944,56.541 89.584,56.541 90.584,56.541 91.584,56.541 92.584,56.541 70.444,57.041 71.444,57.041 72.444,57.041 73.444,57.041 74.444,57.041 89.084,57.041 90.084,57.041 91.084,57.041 92.084,57.041 93.084,57.041 10.723,57.249 11.723,57.249 12.723,57.249 10.723,58.249 12.723,58.249 10.723,59.249 11.723,59.249 12.723,59.249 10.723,74.249 11.723,74.249 12.723,74.249 10.723,75.249 12.723,75.249 70.409,75.54 74.447,75.54 71.444,75.541 72.444,75.541 73.444,75.541 89.084,75.541 90.084,75.541 91.084,75.541 92.084,75.541 93.084,75.541 70.944,76.041 71.944,76.041 72.944,76.041 73.944,76.041 89.584,76.041 90.584,76.041 91.584,76.041 92.584,76.041 10.723,76.249 11.723,76.249 12.723,76.249 70.444,76.541 71.444,76.541 72.444,76.541 73.444,76.541 74.444,76.541 89.084,76.541 90.084,76.541 91.084,76.541 92.084,76.541 93.084,76.541 70.944,77.041 71.944,77.041 72.944,77.041 73.944,77.041 89.584,77.041 90.584,77.041 91.584,77.041 92.584,77.041 70.444,77.541 71.444,77.541 72.444,77.541 73.444,77.541 74.444,77.541 89.084,77.541 90.084,77.541 91.084,77.541 92.084,77.541 93.084,77.541 70.944,78.041 71.944,78.041 72.944,78.041 73.944,78.041 89.584,78.041 90.584,78.041 91.584,78.041 92.584,78.041 70.444,78.541 71.444,78.541 72.444,78.541 73.444,78.541 74.444,78.541 89.084,78.541 90.084,78.541 91.084,78.541 92.084,78.541 93.084,78.541 70.944,79.041 71.944,79.041 72.944,79.041 73.944,79.041 89.584,79.041 90.584,79.041 91.584,79.041 92.584,79.041 70.434,79.527 71.444,79.541 72.444,79.541 73.444,79.541 74.447,79.553 89.084,79.541 90.084,79.541 91.084,79.541 92.194,79.541 93.084,79.541 108.294,81.638 109.294,81.638 110.294,81.638 109.794,82.138 108.731,82.147 109.294,82.638 110.294,82.638 108.794,83.138 109.794,83.138 108.294,83.638 109.294,83.638 110.294,83.638
  other v3: 42.019,24.433 29.094,26.163 42.019,26.643 29.344,26.913 29.094,27.663 21.544,30.138 42.019,41.433 29.094,43.163 42.019,43.643 29.344,43.913 29.094,44.663 21.544,47.138 42.019,58.433 29.094,60.163 42.019,60.643 29.344,60.913 29.094,61.663 21.544,64.138 42.019,75.433 29.094,77.163 42.019,77.643 29.344,77.913 29.264,80.081 21.544,81.138
  other v4: 32.444,23.388 33.344,23.413 31.344,24.413 33.344,24.413 32.444,25.388 33.344,25.413 32.444,40.388 33.344,40.413 31.344,41.413 33.344,41.413 32.444,42.388 33.344,42.413 32.444,57.388 33.344,57.413 31.344,58.413 33.344,58.413 32.444,59.388 33.344,59.413 32.344,74.413 33.344,74.413 31.344,75.413 33.344,75.413 32.344,76.413 33.344,76.413
HWREV0: IC10.C16 R171.2 | length 5.5
  L1 w0.152: IC10.C16@136.97,77.841 141.366,77.841 142.104,78.578 R171.2@142.104,78.598
HWREV1: IC10.D15 R172.2 | length 6.5
  L1 w0.152: IC10.D15@135.97,76.841 136.496,77.367 141.89,77.367 142.104,77.581 R172.2@142.104,77.601
HWREV2: IC10.E15 R173.2 | length 6.5
  L1 w0.152: IC10.E15@135.97,75.841 136.533,76.403 141.89,76.403 142.104,76.617 R173.2@142.104,76.637
HWREV3: IC10.E16 R174.2 | length 5.2
  L1 w0.152: IC10.E16@136.97,75.841 141.95,75.841 R174.2@142.104,75.687
I2C_SCLA: D1A.3 IC8A.1 IC26A.6 J1A.27 R125.1 | length 172.4
  L3 w0.127: v1(107.081,72.997) 107.01,73.068 107.01,73.276 106.828,73.458 106.828,73.846 107.015,74.032 107.015,77.4 107.035,77.42 107.035,79.374 107.947,80.286 111.079,80.286 118.337,87.544 124.717,87.544 125.04,87.867 125.702,87.867 126.285,88.451 126.285,88.782 126.446,88.943 126.446,89.373 126.667,89.594 127.157,89.594 127.415,89.335 127.415,89.263 127.583,89.095 127.832,89.095 127.833,89.094 128.143,89.094 129.536,87.701 133.167,87.701 133.426,87.442 139.974,87.442 142.289,85.127 146.264,85.127 149.43,81.962 149.43,81.858 150.408,80.88 150.81,80.88 154.969,76.721 154.969,19.506 154.075,18.613 150.905,18.613 J1A.27@149.558,17.267
  L3 w0.152: v1(149.558,9.541) 149.558,11.855 150.561,12.858 150.561,15.142 149.558,16.145 J1A.27@149.558,17.267
  L6 w0.127: R125.1@104.758,72.793 105.575,71.976 106.061,71.976 v1(107.081,72.997) ; IC8A.1@146.023,12.208 146.023,13.565 149.558,17.1 J1A.27@149.558,17.267
  L6 w0.152: IC26A.6@133.111,0.819 134.341,0.819 134.844,1.322 134.844,2.284 135.692,3.132 136.562,3.132 137.003,3.573 137.003,4.662 138.09,5.749 141.147,5.749 141.937,6.538 144.444,6.538 146.447,8.541 148.558,8.541 v1(149.558,9.541) ; D1A.3@145.569,16.163 145.569,15.438 144.866,14.735 144.866,13.212 145.118,12.959 145.118,12.889 145.799,12.208 IC8A.1@146.023,12.208
I2C_SCLB: D1B.3 IC8B.1 IC26B.6 J1B.27 | length 20
  L6 w0.127: J1B.27@130.788,17.292 131.855,16.225 131.855,14.166 130.695,13.006 IC26B.6@130.695,11.683 130.695,10.545 131.06,10.18 134.643,10.18 134.671,10.208 136.219,10.208 ; 136.794,6.888 136.219,7.463 136.219,10.208 ; IC8B.1@137.998,10.208 136.219,10.208
  L6 w0.152: 136.794,6.888 137.144,6.538 D1B.3@137.994,6.538
I2C_SDAA: D1A.2 IC8A.3 IC26A.5 J1A.26 R124.1 | length 177.2
  L3 w0.127: v1(107.269,73.641) 107.269,77.295 107.289,77.315 107.289,78.006 108.7,79.417 108.7,79.443 109.038,79.781 111.346,79.781 113.353,81.789 113.353,82.071 118.481,87.198 124.971,87.198 125.386,87.613 125.934,87.613 126.285,87.965 126.411,87.965 126.513,88.066 127.388,88.066 128.008,87.447 132.956,87.447 133.215,87.188 139.869,87.188 142.476,84.581 146.348,84.581 150.303,80.626 150.705,80.626 154.308,77.022 154.308,74.931
  L3 w0.152: v1(148.716,8.104) 148.716,12.916 148.21,13.422 148.21,17.337 149.486,18.613 150.036,18.613 151.098,19.676 151.967,19.676 J1A.26@152.098,19.807 153.394,19.807 154.471,20.884 154.471,74.768 154.308,74.931
  L6 w0.152: R124.1@106.104,72.717 106.104,72.869 106.685,73.45 v1@107.153,73.45 ; IC26A.5@133.111,-0.451 134.06,-0.451 134.301,-0.691 135.941,-0.691 136.404,-0.228 136.404,2.073 137.47,3.139 137.47,4.284 138.511,5.326 143.839,5.326 146.617,8.104 v1(148.716,8.104) ; D1A.2@143.269,16.163 143.969,16.163 144.144,15.988 144.144,13.538 144.694,12.988 144.694,11.119 144.783,11.03 145.052,11.03 145.773,10.308 IC8A.3@146.023,10.308 147.604,10.308 151.032,13.736 151.032,18.74 J1A.26@152.098,19.807 J1A.26@152.134,19.771
I2C_SDAB: D1B.2 IC8B.3 IC26B.5 J1B.26 | length 30
  L3 w0.127: v1(129.425,10.365) 132.898,10.365 v1(134.674,12.141) 134.674,17.288 134.318,17.644 134.318,17.702 133.328,18.693 J1B.26@133.328,19.832
  L6 w0.127: v1(129.425,10.365) IC26B.5@129.425,11.683 ; v1@134.674,12.108 IC8B.3@137.998,12.108
  L6 w0.152: IC8B.3@138.022,12.121 139.062,12.121 139.244,11.938 139.244,9.963 138.756,9.475 137.381,9.475 136.969,9.063 136.969,8.138 137.269,7.838 138.644,7.838 139.119,7.363 139.119,6.863 139.444,6.538 D1B.2@140.294,6.538
IFC_MODE_SEL0: IC10.E14 R111.2 SW1.8 | length 16.4
  L1 w0.152: IC10.E14@134.97,75.841 135.482,76.353 135.482,77.958 135.937,78.413 137.147,78.413 139.12,80.386 139.12,81.567 139.594,82.041 SW1.8@139.794,82.041 139.947,81.888 v1(141.044,81.888)
  L6 w0.152: v1(141.044,81.888) 141.199,81.733 R111.2@147.054,81.733
IFC_MODE_SEL1: IC10.B16 R83.2 SW1.7 | length 14.4
  L1 w0.152: IC10.B16@136.97,78.841 138.353,80.223 138.353,83.339 139.594,84.581 SW1.7@139.794,84.581 139.91,84.465 v1(141.044,84.465)
  L6 w0.152: v1(141.044,84.465) 141.276,84.233 R83.2@147.054,84.233
IFC_MODE_SEL2: IC10.A16 R85.2 SW1.6 | length 16
  L1 w0.152: IC10.A16@136.97,79.841 138.074,80.944 138.074,85.6 139.594,87.121 SW1.6@139.794,87.121 139.862,87.188 v1(140.851,87.188)
  L6 w0.152: v1(140.851,87.188) 141.306,86.733 R85.2@147.054,86.733
IFC_MODE_SEL3: IC10.B15 R86.2 SW1.5 | length 20
  L1 w0.152: IC10.B15@135.97,78.841 136.542,79.413 136.542,82.243 137.574,83.274 137.574,87.64 139.594,89.661 SW1.5@139.794,89.661 139.815,89.682 v1(141.044,89.682)
  L6 w0.152: v1(141.044,89.682) 141.492,89.233 R86.2@147.054,89.233
IN_SEL: IC10.G5 R154.1 | length 47.3
  L1 w0.152: v1@115.641,41.41 v1(115.68,41.45) 115.72,41.489 116.591,41.489 116.734,41.346 R154.1@116.734,40.749 ; v1(125.52,74.266) 125.533,74.266 125.957,73.841 IC10.G5@125.97,73.841
  L3 w0.152: v1(115.68,41.45) 116.212,41.982 116.212,45.419 116.397,45.603 116.397,45.978 115.356,47.019 115.356,66.456 115.366,66.467 115.366,67.115 115.356,67.125 115.356,72.898 115.356,73.268 116.566,74.478 116.609,74.478 117.768,75.636 118.432,75.636 118.485,75.584 121.595,75.584 121.706,75.696 124.817,75.696 125.017,75.495 125.017,75.028 125.282,74.763 125.431,74.763 125.52,74.674 v1(125.52,74.266)
INT_CLK_IN: C190.1 J7.1 | length 2.8
  L1 w0.298: C190.1@151.671,63.513 151.671,63.003 151.969,62.705 J7.1@151.969,60.863
LED0: IC10.E11 R27.1 | length 156.2
  L1 w0.127: R27.1@3.044,75.388 3.829,75.388 3.858,75.417 4.027,75.417 v1(4.094,75.485) ; v1(128.944,90.041) 128.944,84.467 v1(130.42,82.991) ; v1(131.495,75.391) 131.508,75.391 131.958,75.841 IC10.E11@131.97,75.841
  L3 w0.127: v1(130.42,82.991) 130.42,79.249 130.911,78.758 130.911,75.917 131.437,75.391 v1(131.495,75.391)
  L4 w0.127: v1(4.094,75.485) 4.094,75.493 4.856,76.255 4.856,87.975 5.78,88.9 5.78,89.529 6.969,90.718 128.267,90.718 v1(128.944,90.041)
LED1: IC10.B10 R28.1 | length 157
  L1 w0.127: v1(3.597,70.688) R28.1@4.795,70.688 ; v1(129.717,89.585) 129.717,85.133 131.41,83.44 131.41,79.281 IC10.B10@130.97,78.841
  L4 w0.127: v1(3.597,70.688) 3.033,71.251 3.033,73.67 5.78,76.417 5.78,88.283 7.961,90.464 127.898,90.464 128.762,89.6 129.702,89.6 v1(129.717,89.585)
LED2: IC10.A13 R29.1 | length 179.3
  L1 w0.127: R29.1@3.031,58.249 3.521,58.249 3.764,58.492 3.764,58.653 v1(3.835,58.725) ; v1(133.553,89.966) 134.47,89.048 134.47,82.145 133.97,81.644 IC10.A13@133.97,79.841
  L3 w0.127: v1(3.597,89.323) 3.597,89.266 3.206,88.875 3.206,88.455 4.859,86.802 4.859,77.721 3.768,76.63 3.768,76.5 3.51,76.242 2.155,76.242 0.493,74.581 0.493,71.922 4.815,67.601 4.815,59.704 v1(3.835,58.725)
  L4 w0.127: v1(3.597,89.323) 4.856,89.323 6.759,91.226 132.293,91.226 v1(133.553,89.966)
LED3: IC10.A11 R30.1 | length 180.1
  L1 w0.127: v1(3.033,53.465) 3.118,53.465 3.294,53.288 R30.1@5.044,53.288 ; v1(130.353,90.195) 130.305,90.147 130.305,89.745 130.251,89.691 130.251,84.958 131.97,83.239 IC10.A11@131.97,79.841
  L3 w0.127: v1(3.033,53.465) 3.033,53.566 2.779,53.82 2.779,57.143 3.921,58.284 4.018,58.284 4.811,59.078 4.811,59.342 5.069,59.599 5.069,67.706 2.575,70.2 2.575,74.948 4.022,76.395 4.022,76.525 5.113,77.616 5.113,87.206 v1(3.672,88.647)
  L4 w0.127: v1(3.672,88.647) 3.831,88.807 4.699,88.807 6.864,90.972 129.576,90.972 v1(130.353,90.195)
LED4: IC10.A14 R43.1 | length 194.1
  L1 w0.127: v1(4.318,42.215) 4.318,41.593 R43.1@4.552,41.358 ; v1(134.747,90.601) 134.747,90.5 134.978,90.268 134.978,79.849 IC10.A14@134.97,79.841
  L3 w0.127: v1(4.318,42.215) 4.318,42.316 4.473,42.47 4.473,43.572 4.815,43.914 4.815,50.063 4.195,50.682 4.195,54.307 3.033,55.469 3.033,57.038 4.026,58.03 4.123,58.03 5.065,58.973 5.065,59.236 5.323,59.493 5.323,68.123 5.062,68.383 5.062,68.6 3.414,70.248 3.156,70.506 3.156,70.67 2.829,70.998 2.829,74.842 4.276,76.29 4.276,76.42 5.367,77.511 5.367,90.608 5.985,91.226 76.901,91.226 76.919,91.243 134.104,91.243 v1(134.747,90.601)
LED5: IC10.B14 R44.1 | length 199.1
  L1 w0.127: v1(3.229,35.541) 3.907,35.541 4.603,36.237 4.623,36.237 4.85,36.463 R44.1@4.85,36.483 ; v1(134.264,90.144) 134.724,89.683 134.724,81.978 134.554,81.808 134.554,79.256 IC10.B14@134.97,78.841
  L3 w0.127: v1(3.229,35.541) 3.229,38.215 3.033,38.41 3.033,39.419 4.808,41.194 4.808,42.208 5.069,42.469 5.069,54.463 5.115,54.509 5.115,57.293 5.319,57.498 5.319,59.131 5.577,59.388 5.577,68.228 5.319,68.485 5.319,77.104 5.621,77.406 5.621,90.266 6.302,90.947 76.982,90.947 77.024,90.989 133.418,90.989 v1(134.264,90.144)
LED6: IC10.A12 R25.1 | length 214.6
  L1 w0.127: R25.1@1.234,18.893 2.204,18.893 v1(2.234,18.863) ; v1(132.298,89.144) 132.97,88.472 IC10.A12@132.97,79.841
  L3 w0.127: v1(2.234,18.863) 3.229,18.863 5.573,21.208 5.573,23.629 6.199,24.255 6.199,27.709 5.905,28.004 5.905,38.226 5.573,38.557 5.573,42.255 5.577,42.258 5.577,52.881 7.884,55.188 7.884,57.3 6.302,58.882 6.302,59.831 6.102,60.031 6.102,68.472 6.698,69.068 6.698,69.929 7.229,70.46 7.229,70.893 8.295,71.959 8.295,73.203 7.884,73.614 7.884,73.746 6.129,75.501 6.129,89.881 6.636,90.389 23.427,90.389 23.498,90.318 76.65,90.318 76.664,90.304 127.873,90.304 128.05,90.481 129.444,90.481 130.244,89.682 130.245,89.682 130.353,89.574 131.191,89.574 131.621,89.144 v1(132.298,89.144)
LED7: IC10.B11 R26.1 | length 205.9
  L1 w0.127: v1(4.794,23.873) 4.794,24.633 R26.1@4.824,24.663 ; v1(131.194,90.291) 131.194,85.363 132.386,84.171 132.386,79.256 IC10.B11@131.97,78.841
  L3 w0.127: v1(4.794,23.873) 4.794,24.888 5.032,25.127 5.032,38.202 5.194,38.363 5.194,39.839 5.062,39.971 5.062,41.906 5.319,42.163 5.319,42.361 5.323,42.364 5.323,52.986 5.875,53.538 5.875,55.256 5.573,55.557 5.573,59.026 5.831,59.283 5.831,68.333 5.573,68.59 5.573,73.419 5.875,73.721 5.875,90.086 6.456,90.668 77.062,90.668 77.129,90.735 130.749,90.735 v1(131.194,90.291)
LOOP_FILTER1A: C112A.2 IC2A.2 R90A.2 | length 8.4
  L1 w0.127: R90A.2@62.444,70.341 63.194,69.591 63.194,69.241 63.919,68.516 C112A.2@63.944,68.491 ; C112A.2@64.069,68.616 64.194,68.491 64.894,68.491 65.392,68.989 65.392,70.463 65.942,71.013 66.819,71.013 66.944,70.888 IC2A.2@66.944,69.841
LOOP_FILTER1B: C112B.2 IC2B.2 R90B.2 | length 9
  L1 w0.127: R90B.2@62.444,47.841 63.035,47.249 62.985,47.249 63.194,47.041 63.194,46.741 63.919,46.016 64.144,45.791 65.194,45.791 65.392,45.989 65.392,47.963 65.942,48.513 66.819,48.513 66.944,48.388 IC2B.2@66.944,47.341
LOOP_FILTER1C: C112C.2 IC2C.2 R90C.2 | length 8
  L1 w0.127: R90C.2@62.444,25.341 63.194,24.591 63.194,24.291 C112C.2@63.944,23.541 63.944,23.491 63.969,23.516 64.56,24.107 64.51,24.107 64.944,24.541 64.944,25.015 65.942,26.013 66.819,26.013 66.944,25.888 IC2C.2@66.944,24.841
LOOP_FILTER1D: C112D.2 IC2D.2 R90D.2 | length 7.9
  L1 w0.127: R90D.2@62.694,2.791 62.694,2.541 63.194,2.041 63.194,1.791 C112D.2@63.944,1.041 63.944,0.991 63.969,1.016 64.694,1.741 64.694,2.508 65.15,2.963 65.392,2.963 65.942,3.513 66.819,3.513 66.944,3.388 IC2D.2@66.944,2.341
LOOP_FILTERA: C30A.2 IC13A.31 R89A.1 R140A.2 | length 9.6
  L1 w0.203: IC13A.31@94.334,73.091 94.334,72.741 94.663,72.412 95.001,72.412 95.325,72.736 95.606,72.736 95.631,72.761 95.817,72.761 95.844,72.788 R89A.1@96.724,72.788 96.724,72.35 97.155,71.919 97.136,71.899 97.636,71.899 C30A.2@97.944,71.591 97.944,71.541 97.694,71.291 v1(96.444,71.291)
  L6 w0.203: v1(96.444,71.291) 96.444,70.791 R140A.2@98.894,70.791
LOOP_FILTERB: C30B.2 IC13B.31 R89B.1 R140B.2 | length 8
  L1 w0.203: IC13B.31@94.334,50.591 94.334,50.241 94.663,49.912 95.001,49.912 95.325,50.236 95.606,50.236 95.756,50.385 96.234,50.385 96.234,50.288 R89B.1@96.724,50.288 96.879,50.133 96.879,49.828 ; v1(96.701,49.017) 96.726,49.042 96.726,49.601 96.879,49.753 96.879,49.828 ; C30B.2@97.694,49.091 97.616,49.091 96.879,49.828
  L6 w0.203: v1@96.694,48.791 96.944,48.541 R140B.2@98.894,48.541
LOOP_FILTERC: C30C.2 IC13C.31 R89C.1 R140C.2 | length 7.2
  L1 w0.152: v1(96.694,26.791) 97.244,26.791 C30C.2@97.444,26.591
  L1 w0.203: IC13C.31@94.334,28.091 94.334,27.741 94.663,27.412 95.001,27.412 95.325,27.736 95.606,27.736 95.756,27.885 96.234,27.885 96.234,27.788 R89C.1@96.724,27.788 v1@96.724,26.863
  L6 w0.152: v1(96.694,26.791) 96.694,26.541 97.444,25.791 R140C.2@98.394,25.791
LOOP_FILTERD: C30D.2 IC13D.31 R89D.1 R140D.2 | length 8.8
  L1 w0.152: v1(96.694,4.041) 96.744,4.091 C30D.2@97.444,4.091
  L1 w0.203: IC13D.31@94.334,5.591 94.334,5.241 94.663,4.912 95.001,4.912 95.325,5.236 95.606,5.236 95.756,5.385 96.234,5.385 96.234,5.288 R89D.1@96.724,5.288 96.694,5.258 v1(96.694,4.041)
  L6 w0.152: v1(96.694,4.041) 99.894,4.041 R140D.2@100.144,4.291
LVDS0A_N: IC1A.48 J1A.3 R7A.2 | length 10.1
  L6 w0.152: IC1A.48@145.031,46.346 145.031,47.546 145.031,48.447 145.034,48.45 145.034,48.546 145.466,48.978 145.755,48.978 145.762,48.985 146.158,48.985 146.165,48.978 148.982,48.978 149.006,48.954 150.613,48.954 150.918,48.649 150.919,48.649 150.017,47.747 J1A.3@149.558,47.747
LVDS0A_P: IC1A.47 J1A.2 R7A.1 | length 10.6
  L6 w0.152: IC1A.47@144.531,46.346 144.531,47.546 144.531,48.252 144.727,48.447 144.727,48.573 144.729,48.576 144.729,48.672 145.339,49.283 145.629,49.283 145.636,49.289 146.284,49.289 146.291,49.283 149.108,49.283 149.133,49.258 150.739,49.258 150.88,49.117 150.929,49.117 J1A.2@152.098,50.287
LVDS0B_N: IC1B.48 IC4.5 J1B.3 R7B.2 | length 11.1
  L6 w0.152: IC1B.48@125.808,46.732 125.808,47.712 R7B.2@126.028,47.932 125.758,48.202 IC4.5@125.758,49.082 125.832,49.156 125.832,49.506 125.921,49.595 129.006,49.595 129.632,48.969 129.721,48.88 131.848,48.88 131.848,48.62 131.228,48 130.968,48 130.968,47.953 J1B.3@130.788,47.772
LVDS0B_P: IC1B.47 IC4.6 J1B.2 R7B.1 | length 12.1
  L6 w0.152: IC1B.47@125.308,46.732 125.308,47.712 R7B.1@125.088,47.932 125.258,48.102 IC4.6@125.258,49.082 125.258,49.714 125.525,49.981 126.446,49.981 126.527,49.9 129.132,49.9 129.848,49.185 132.2,49.185 J1B.2@133.328,50.312
LVDS1A_N: IC1A.4 J1A.6 R9A.2 | length 7.4
  L6 w0.152: IC1A.4@145.731,44.146 146.993,44.146 R9A.2@147.164,44.146 ; R9A.2@146.993,43.975 R9A.2@147.164,44.146 ; J1A.6@152.098,45.207 150.713,43.822 148.683,43.822 148.252,44.253 147.272,44.253 R9A.2@147.164,44.146
LVDS1A_P: IC1A.3 J1A.5 R9A.1 | length 6.6
  L6 w0.152: IC1A.3@145.731,44.646 146.993,44.646 147.262,44.646 147.349,44.558 148.378,44.558 148.81,44.126 150.41,44.126 150.595,44.311 150.595,44.437 149.826,45.207 J1A.5@149.558,45.207
LVDS1B_N: IC1B.4 IC16.5 J1B.6 R9B.2 | length 10.8
  L1 w0.152: IC16.5@125.348,46.135 125.348,45.327 125.306,45.285 125.306,44.889 125.666,44.529 125.76,44.435 v1(125.572,44.435)
  L6 w0.152: v1(125.572,44.435) 125.598,44.435 125.695,44.532 IC1B.4@126.508,44.532 127.187,44.532 ; 127.187,44.568 127.248,44.63 127.683,44.63 129.153,44.63 129.903,43.88 131.724,43.88 133.076,45.232 J1B.6@133.328,45.232
LVDS1B_P: IC1B.3 IC16.6 J1B.5 R9B.1 | length 9.3
  L1 w0.152: v1@125.848,45.033 125.848,45.066 IC16.6@125.848,46.135
  L6 w0.152: v1(125.862,45.066) 125.816,45.066 125.782,45.032 125.862,45.032 IC1B.3@126.508,45.032 127.085,45.032 127.183,44.934 127.683,44.934 129.279,44.934 130.029,44.185 131.598,44.185 131.848,44.435 131.848,44.784 131.4,45.232 J1B.5@130.788,45.232
LVDS2A_N: IC1A.10 J1A.9 R11A.2 | length 7.6
  L6 w0.152: IC1A.10@145.731,41.146 146.931,41.146 147.763,41.146 147.835,41.218 150.377,41.218 150.514,41.082 ; 150.514,41.082 J1A.9@149.558,40.127 150.514,41.082
LVDS2A_P: IC1A.9 J1A.8 R11A.1 | length 7
  L6 w0.152: IC1A.9@145.731,41.646 146.931,41.646 147.713,41.646 147.835,41.523 150.543,41.523 150.686,41.38 150.812,41.38 J1A.8@152.098,42.667
LVDS2B_N: IC1B.10 J1B.9 R11B.2 | length 7.5
  L6 w0.152: IC1B.10@126.508,41.532 127.658,41.532 128.214,41.532 128.304,41.622 ; 128.304,41.63 128.598,41.63 129.043,41.185 131.82,41.185 132.038,40.967 132.038,40.885 131.305,40.152 J1B.9@130.788,40.152
LVDS2B_P: IC1B.9 J1B.8 R11B.1 | length 7.5
  L6 w0.152: IC1B.9@126.508,42.032 127.658,42.032 128.25,42.032 128.33,41.952 ; 128.33,41.934 128.724,41.934 129.169,41.489 132.125,41.489 J1B.8@133.328,42.692
LVDS3A_N: IC1A.14 J1A.12 R13A.2 | length 10.8
  L6 w0.152: IC1A.14@144.531,39.446 144.531,38.466 R13A.2@144.336,38.271 144.654,37.953 144.654,37.447 145.95,36.151 150.461,36.151 151.896,37.587 J1A.12@152.098,37.587
LVDS3A_P: IC1A.13 J1A.11 R13A.1 | length 10
  L6 w0.152: IC1A.13@145.031,39.446 145.031,38.516 R13A.1@145.276,38.271 144.959,37.953 144.959,37.573 146.076,36.456 150.334,36.456 150.715,36.837 150.715,36.965 150.094,37.587 J1A.11@149.558,37.587
LVDS3B_N: IC1B.14 J1B.12 R13B.2 | length 11.5
  L4 w0.15: v1(125.293,37.887) 125.293,37.982 125.447,38.135 125.447,38.495 125.883,38.931 131.345,38.931 132.218,38.058 132.218,37.674 132.306,37.586 J1B.12@133.328,37.586
  L6 w0.152: v1(125.293,37.887) 125.405,37.999 125.405,39.008 125.308,39.106 IC1B.14@125.308,39.832
LVDS3B_P: IC1B.13 J1B.11 R13B.1 | length 10.4
  L4 w0.15: v1(125.92,37.887) 125.92,37.982 125.767,38.135 125.767,38.362 126.016,38.611 131.212,38.611 131.898,37.926 131.898,37.674 131.81,37.586 J1B.11@130.788,37.586
  L6 w0.152: IC1B.13@125.808,39.832 125.808,37.999 v1(125.92,37.887)
LVDS4A_N: IC6A.48 J1A.15 R16A.2 | length 9.2
  L6 w0.152: IC6A.48@145.181,32.346 145.181,33.546 145.181,34.218 145.207,34.244 145.26,34.297 147.693,34.297 148.277,33.712 150.336,33.712 150.563,33.485 150.563,33.282 149.788,32.507 J1A.15@149.558,32.507
LVDS4A_P: IC6A.47 J1A.14 R16A.1 | length 10.2
  L6 w0.152: IC6A.47@144.681,32.346 144.681,33.072 144.674,33.072 144.674,33.433 R16A.1@144.561,33.546 144.561,33.68 144.877,33.996 144.877,34.344 144.879,34.347 145.134,34.601 147.819,34.601 148.403,34.017 151.069,34.017 J1A.14@152.098,35.047
LVDS4B_N: IC6B.48 J1B.15 R16B.2 | length 10
  L6 w0.152: IC6B.48@125.808,31.732 125.808,32.458 125.71,32.556 125.71,32.932 125.71,33.935 125.96,34.185 129.836,34.185 129.88,34.141 ccw(c130.788,35.046) 130.012,34.025 130.407,33.63 131.614,33.63 131.75,33.494 J1B.15@130.788,32.532
LVDS4B_P: IC6B.47 J1B.14 R16B.1 | length 11.2
  L6 w0.152: IC6B.47@125.308,31.732 125.308,32.458 125.405,32.556 125.405,32.932 125.405,34.061 125.808,34.464 129.968,34.464 130.011,34.412 ccw(c130.788,35.046) 130.195,34.237 130.204,34.229 130.497,33.935 132.19,33.935 J1B.14@133.328,35.072